# EAGLE board ESP32_heart_revC3_check (EAGLE 9.6.1)
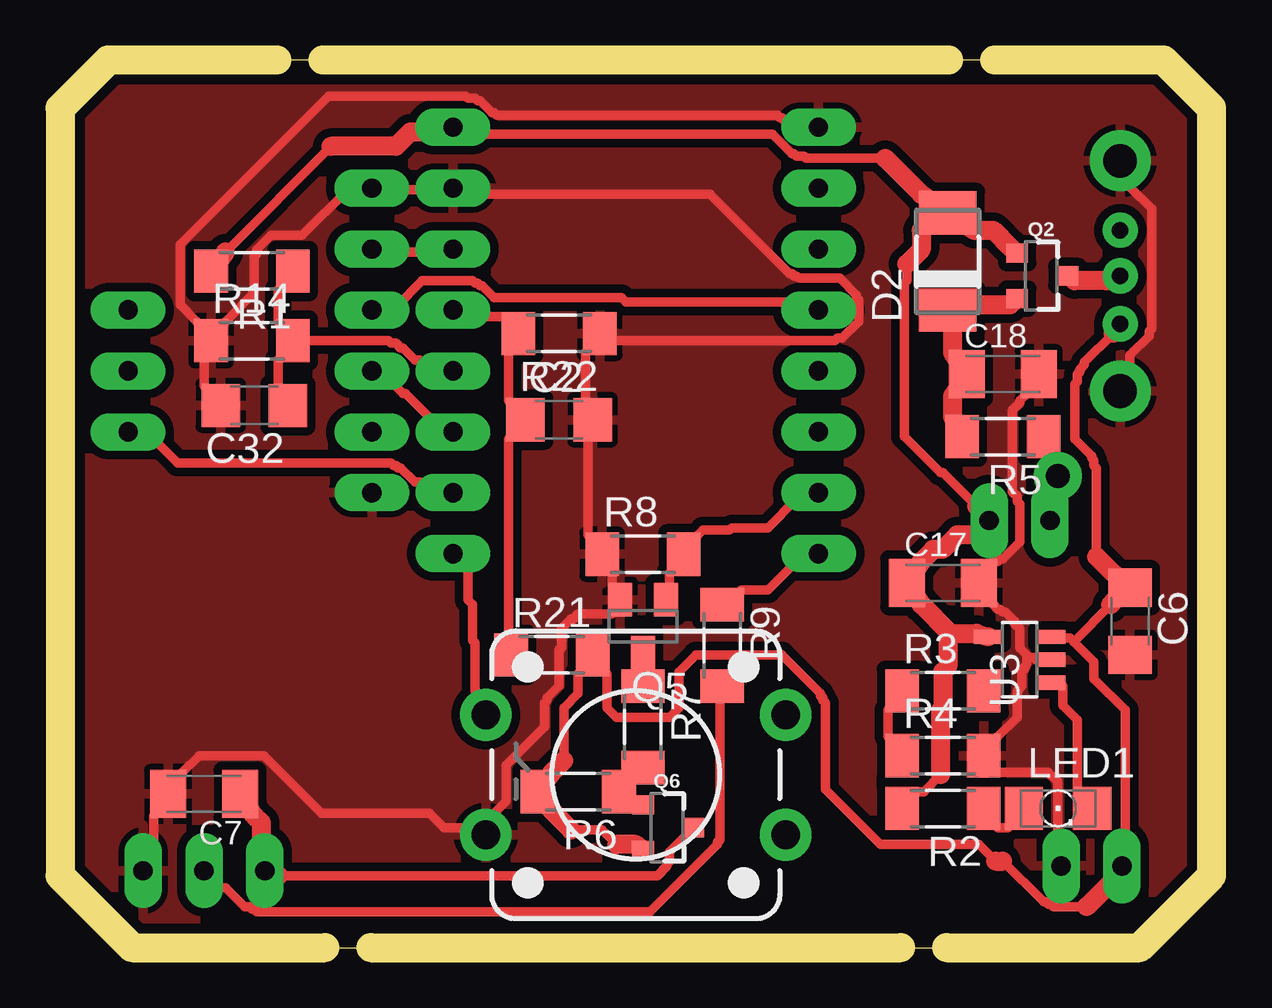
[diagram p0: board, top side]
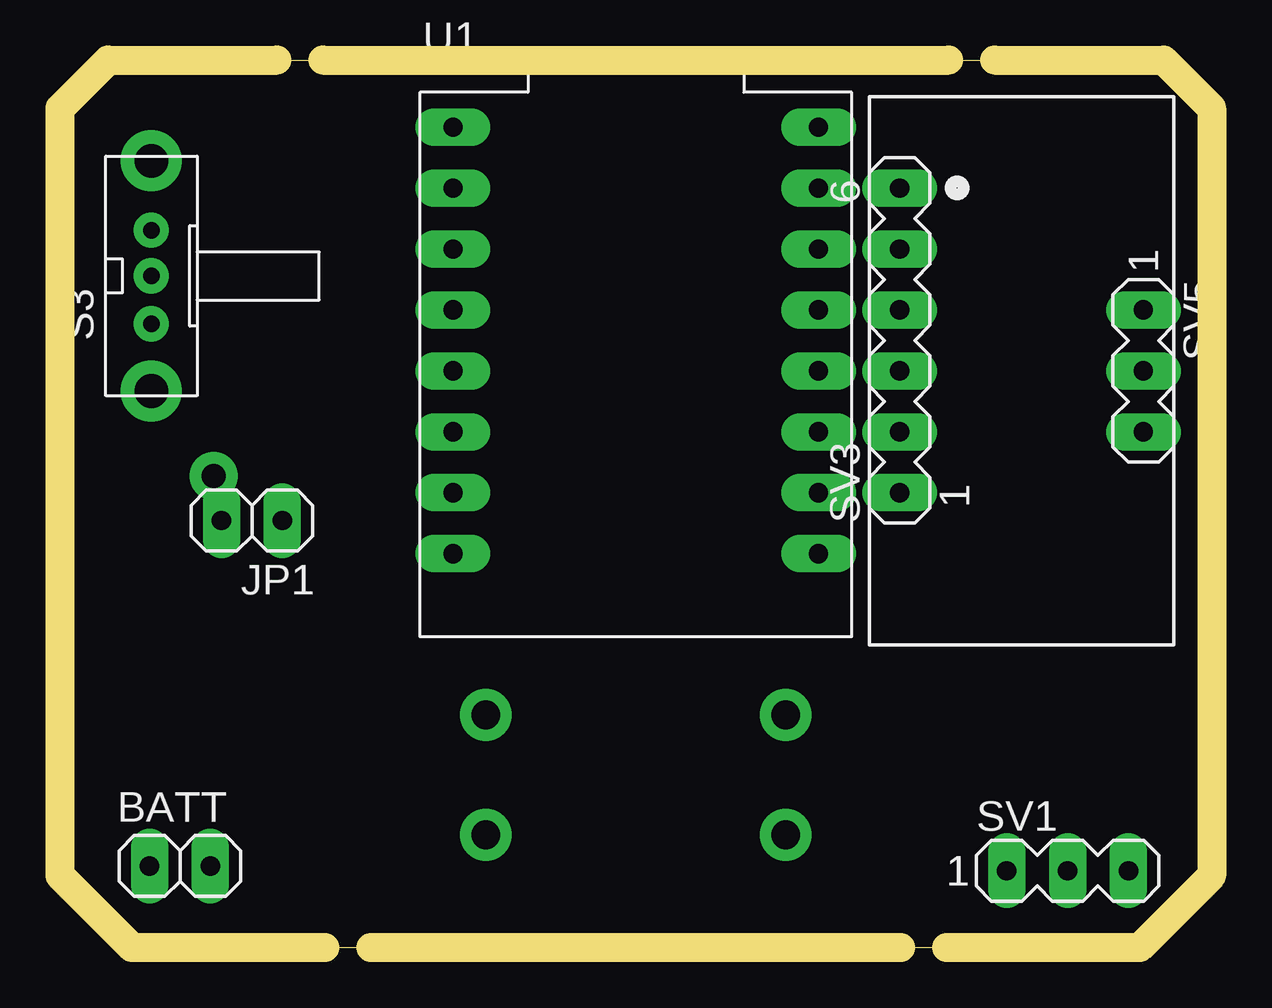
[diagram p1: board, bottom side, seen from below]

Size 48 x 37 mm. Coordinates in mm from the lower left corner, seen from the top.
Outline: 3,0 45,0 48,3 48,35 46,37 2,37 0,35 0,3 3,0
Copper layers (1*16): Top 0.035mm / dielectric 1.5mm / Bottom 0.035mm
Design rules "default *": minimum track width 0.4mm, minimum drill 1mm, track to track 0.3mm, track to pad 0.3mm, pad to pad 0.3mm, via to via 0.3mm, smd to smd 6mil, copper to edge 40mil, drill to drill 0.5mm, minimum pad ring 15mil, minimum via ring 8mil, stop-mask expansion 4mil, vias tented up to drill 0mil, thermal gap 10mil
Milling: 12 lines

## Footprints (pad centres in the part's own frame; a part is rotated, then mirrored left to right if it is on the bottom)
1X02 = drill 0.8 pad 1.3 long: 1 -1.27,0; 2 1.27,0
C1206 = smd 1.6 x 1.8: 1 -1.4,0; 2 1.4,0
C1206K = smd 1.5 x 2: 1 -1.5,0; 2 1.5,0
DO-214AC = smd 1.8 x 2.4: A 2.025,0; C -2.025,0
1206 = smd 1.6 x 1.803: A -1.422,0; C 1.422,0
SOT23-3 = smd 0.8 x 0.9: 1 -0.95,-1; 2 0.95,-1; 3 0,1.1
SOT23 = smd 1 x 1.4: 1 -0.95,-1.1; 2 0.95,-1.1; 3 0,1.1
M1406 = smd 1.4 x 1.8: 1 -1.7,0; 2 1.7,0
TACTILE-PTH-12MM = drill 1.2 pad 2.159: 1 6.25,-2.5; 2 -6.25,-2.5; 3 6.25,2.5; 4 -6.25,2.5
EG1213 = drill 0.7 pad 1.422: 1 -2,0; 2 0,0; 3 1.9,0 | drill 1.4 pad 2.54: MT1 -4.8,0; MT2 4.8,0
MA03-1 = drill 0.8 pad 1.3 long: 1 -2.54,0; 2 0,0; 3 2.54,0
MA06-1 = drill 0.8 pad 1.3 long: 1 -6.35,0; 2 -3.81,0; 3 -1.27,0; 4 1.27,0; 5 3.81,0; 6 6.35,0
MODULE_ESP32-C3_SUPERMINI_TH = drill 0.8 pad 1.3 long: 0 7.62,-7.88; 1 7.62,-5.34; 2 7.62,-2.8; 3 7.62,-0.26; 3.3 7.62,4.82; 4 7.62,2.28; 5 -7.62,9.9; 5V 7.62,9.9; 6 -7.62,7.36; 7 -7.62,4.82; 8 -7.62,2.28; 9 -7.62,-0.26; 10 -7.62,-2.8; 20 -7.62,-5.34; 21 -7.62,-7.88; G 7.62,7.36
TP4054 = smd 0.6 x 1.2: 1 -0.95,-1.306; 2 0,-1.306; 3 0.95,-1.306; 4 0.95,1.306; 5 -0.95,1.306

## Placement (x,y rotation side)
BATT  [1X02]  43,3.4 0 bottom
C2  100nf  [C1206]  20.8,22 0 top
C6  1uf  [C1206]  44.6,13.6 270 top
C7  100nf  [C1206K]  6,6.4 180 top
C17  100nf  [C1206K]  36.8,15.2 0 top
C18  100nf  [C1206K]  39.3,23.9 0 top
C32  100nf  [C1206]  8.1,22.6 180 top
D2  [DO-214AC]  37,28.6 90 top
JP1  [1X02]  40,17.8 180 bottom
LED1  DNP  [1206]  41.6,5.8 0 top
Q2  CMN3401M  [SOT23-3]  40.9,28 270 top
Q5  CMN2302BSM  [SOT23]  24.3,13.4 180 top
Q6  CMN3401M  [SOT23-3]  25.3,5 270 top
R1  68k  [M1406]  8,28.2 180 top
R2  1K  [M1406]  36.8,5.8 180 top
R3  1K  [M1406]  36.8,10.7 0 top
R4  1K  [M1406]  36.8,8 0 top
R5  0  [M1406]  39.3,21.3 180 top
R6  10K  [M1406]  21.6,6.5 180 top
R7  1K  [M1406]  24.3,9.2 270 top
R8  10K  [M1406]  24.3,16.4 0 top
R9  330  [M1406]  27.6,12.6 270 top
R14  100k  [M1406]  8,25.3 0 top
R21  1M  [M1406]  20.5,12.2 0 top
R22  1M  [M1406]  20.8,25.6 180 top
S1  SWITCH-MOMENTARY-2-CLOSED  [TACTILE-PTH-12MM]  24,7.2 180 top
S3  EG1213  [EG1213]  44.19,28 90 bottom
SV1  [MA03-1]  6,3.2 0 bottom
SV3  [MA06-1]  13,25.31 90 bottom
SV5  [MA03-1]  2.84,24.04 270 bottom
U1  ESP32-C3_SUPERMINI_TH  [MODULE_ESP32-C3_SUPERMINI_TH]  24,24.3 0 bottom
U3  TP4054  [TP4054]  40,12 90 top

## Library data of the parts
BATT JP1 = pinhead
C2 C6 C7 C17 C18 C32 LED1 Q5 R1-R9 R14 R21 R22 S3 = adafruit
D2 = diode
Q2 Q6 = SparkFun-DiscreteSemi; PROD_ID: TRANS-08285
S1 = SparkFun-Retired
SV1 SV3 SV5 = con-lstb; OC_FARNELL: unknown; OC_NEWARK: unknown
U1 = ESP32-C3_SUPERMINI_TH; AVAILABILITY: Not in stock; CHECK_PRICES: https://www.snapeda.com/parts/ESP32-C3%20SuperMini_TH/Espressif+Systems/view-part/?ref=eda; DESCRIPTION: Super tiny ESP32-C3 board; MF: Espressif Systems; MP: ESP32-C3 SuperMini_TH; PACKAGE: Package; PRICE: None; SNAPEDA_LINK: https://www.snapeda.com/parts/ESP32-C3%20SuperMini_TH/Espressif+Systems/view-part/?ref=snap
U3 = TP4054

## Nets
3V3: SV3.2 U1.3.3
6: U1.6
A1: S1.1 U1.0
BATT+: BATT.1 C6.1 Q6.2 R6.2 R21.2 S3.3 U3.3
GND: BATT.2 C2.2 C6.2 C7.2 C17.2 C18.2 C32.2 Q5.2 R4.2 R8.1 R14.1 R22.1 S1.3 S3.MT1 S3.MT2 SV1.3 SV3.1 U1.5 U1.G U3.2
IMU_INT: SV5.1 U1.1
LED_CTRL: R9.1 U1.21
LED_DIN: R9.2 SV1.2
LED_EN: Q5.1 R8.2 U1.20
N$1: R3.2 U3.5
N$2: R3.1 R4.1
N$4: LED1.C U3.1
N$5: LED1.A R2.1
N$6: Q2.3 S3.2
N$7: Q5.3 R7.1
N$14: Q6.1 R6.1 R7.2
N$15: C7.1 Q6.3 SV1.1
N$18: C18.1 D2.C Q2.2 R5.2
SCL: SV3.4 U1.2
SDA: SV3.3 U1.8
USB_CHARGE: C32.1 R1.1 R14.2 U1.3
USB_IN: C17.1 D2.A JP1.1 Q2.1 R1.2 R2.2 U1.5V U3.4
USB_OUT: JP1.2 R5.1
VBAT_SENSE: C2.1 R21.1 R22.2 U1.4

## Tracks (layer width: path | path; a pad name or v marks a point on that pad's centre or on a via)
3V3
  Top 0.4: U1.3.3 15.4,29 14,29 13,29.12
A1
  Top 0.4: U1.0 17,15.9 17,14.5 17.2,14.3 17.2,12.8 17.3,12.7 17.3,10.7 17.4,10.6 S1.1
BATT+
  Top 0.4: 43.9,25.6 42.7,24.4 42.7,24.3 42.5,24.1 42.5,24 42.4,23.9 42.4,23.6 42.3,23.5 42.3,21.2 43,20.5 43,20.4 43.1,20.3 43.1,20.1 43.2,20 43.2,16.3 | R21.2 21.6,11.4 21.6,10.6 21,10 21,7.8 | 23.2,4.3 22.6,4.9 21.3,4.9 | 22.03,11.98 22.8,11.4 22.8,10 23.2,9.6 25.4,9.6 25.8,10 25.8,11.5 26.5,12.2 30.1,12.2 31.7,10.6 31.7,10.5 31.8,10.4 31.8,10.3 31.9,10.2 31.9,6.6 34.2,4.3 38.3,4.3 39,3.6 | 39.3,3.6 41,1.9 41.1,1.9 41.2,1.8 41.3,1.8 41.4,1.7 42.8,1.7 | 44.4,4.4 44.4,9.9 43.1,11.2 43.1,11.9 42.1,12.9 41.8,12.9 U3.3 | 42.25,12.75 43.8,14.3
  Top 0.8: 44.19,26.1 43.9,25.6 | 43.2,16.3 43.8,15.7 C6.1 | 21,7.8 20.5,7.3 R6.2 20.5,5.7 21.3,4.9 | Q6.2 24,4.3 23.2,4.3 | 39,3.6 39.3,3.6 | 42.8,1.7 43.8,2.7 BATT.1 44.4,4.4 | 43.8,14.3 44.49,15.09
GND
  Top 0.4: S3.MT1 44.6,24.3 44.6,24.7 45.4,25.5 45.4,25.7 45.5,25.8 45.5,30.8 44.6,31.7 S3.MT2 | C18.2 40.2,23 40,22.8 40,22.7 39.7,22.4 39.7,19 39.9,18.8 39.9,18.6 40,18.5 40,16.9 39.3,16.2 39.2,16.2 39.1,16.1 38.9,16.1 C17.2 38.9,14.3 39.1,14.1 39.2,14.1 39.3,14 39.4,14 39.8,13.6 39.8,13.5 40,13.3 40,12.5 40.4,12.1 40.6,12.1 40.7,12 U3.2 | U1.5 30.7,34.5 30.2,34.5 30.1,34.6 30,34.6 29.9,34.7 18.2,34.7 18.1,34.8 18,34.8 17.5,35.3 17.4,35.3 17.3,35.4 17,35.4 16.9,35.5 11.2,35.5 5,29.3 5,26.8 5.7,26.1 R14.1 6,24.5 6,23.4 C32.2 | 6.13,25.52 6.9,26.1 8.1,27.3 8.1,28.8 8.2,28.9 8.2,29.1 8.8,29.7 10.1,29.7 12,31.6 13,31.66 14,31.6 15.4,31.6 U1.G 17.3,31.4 27.1,31.4 30.4,28.1 30.5,28.1 30.6,28 30.7,28 30.8,27.9 32.5,27.9 33.2,27.2 33.2,27.1 33.3,27 33.3,26.1 32.6,25.4 32.4,25.4 32.3,25.3 23.1,25.3 R22.1 21.9,24.8 21.9,22.8 C2.2 22,21.2 22,17.2 R8.1 23,15.6 23,15.1 Q5.2 23,13.9 21.6,13.9 21.4,13.7 21.3,13.7 20.9,13.3 20.9,12.5 20.8,12.4 20.8,10.9 20.3,10.4 20.3,10.3 20.2,10.2 20.2,9.2 18.6,7.6 18.6,6.1 18.1,5.6 S1.3 16.8,5 16,5 15.4,5.6 10.9,5.6 8.5,8 5.8,8 5.1,7.3 C7.2 3.9,5.5 3.9,4.5 3.6,4.2 SV1.3 | 40.35,12.15 40.3,12.1 40.3,11.8 40.2,11.7 40.2,11.6 40.1,11.5 40.1,10.9 39.9,10.7 39.9,9.6 39.1,8.8 R4.2 39.1,7.3 41.2,7.3 41.6,6.9 41.6,4.4 BATT.2
  pour Top (isolate 0.35): 3,0 45,0 48,3 48,35 46,37 2,37 0,35 0,3
IMU_INT
  Top 0.4: U1.1 15.4,19.1 15.2,19.3 15.1,19.3 15,19.4 14.8,19.4 14.2,20 14.1,20 14,20.1 13.9,20.1 13.8,20.2 4.9,20.2 3.8,21.3 2.84,21.5
LED_CTRL
  Top 0.4: U1.21 30.7,16.1 29.5,14.9 28.4,14.9 R9.1
LED_DIN
  Top 0.4: SV1.2 6.5,2.5 6.9,2.5 7.7,1.7 7.9,1.7 8,1.6 8.1,1.6 8.2,1.5 24.6,1.5 27.4,4.3 27.4,4.4 27.5,4.5 27.5,10.3 R9.2
LED_EN
  Top 0.4: U1.20 30.7,18.7 29.5,17.5 28,17.5 27.9,17.4 26.8,17.4 26.6,17.2 R8.2 25.4,15.6 25.4,15.1 Q5.1
N$2
  Top 0.4: R3.1 34.5,9.9 34.5,8.8 R4.1
N$4
  Top 0.4: U3.1 41.8,10.9 41.8,10.1 42.4,9.5 42.4,6.6 LED1.C
N$5
  Top 0.4: R2.1 39.1,5 39.5,5 LED1.A
N$6
  Top 0.8: S3.2 43.6,27.8 42.3,27.8 Q2.3
N$15
  Top 0.4: 9.1,3 24.9,3 25.3,3.4 25.3,3.5 25.4,3.6 25.4,4 Q6.3
  Top 0.8: 9.1,3 SV1.1 8.4,4.2 8.4,5.2 8.1,5.5 C7.1
N$18
  Top 0.8: D2.C 37.2,25.8 37.2,24.8 C18.1 37.2,23 37.2,22.1 R5.2 | 37.01,26.52 38.1,26.8 39.6,26.8 Q2.2
SCL
  Top 0.4: U1.2 15.6,21.9 14.4,23.1 14.3,23.1 13.8,23.6 13,24.04
SDA
  Top 0.4: U1.8 30.7,26.9 23.6,26.9 23.4,27.1 18.1,27.1 17.6,27.6 17.5,27.6 17.4,27.7 17.3,27.7 17.2,27.8 15.1,27.8 14,26.7 13,26.58
USB_CHARGE
  Top 0.4: U1.3 15.4,24.2 15.2,24.4 15.1,24.4 15,24.5 14.8,24.5 14.3,25 14.2,25 14,25.2 13.8,25.2 13.7,25.3 R14.2 | R14.2 9.1,24.5 9.1,23.4 C32.1 | R14.2 9.1,26.1 9.1,27.4 R1.1
USB_IN
  Top 0.4: 11.3,33.4 6.9,29 | 17.3,33.9 29.7,33.9 30.5,33.1 30.6,33.1 30.7,33 31,33 31.1,32.9 34.4,32.9 | 35.3,28.5 35.3,27.8 35.2,27.7 35.2,21.3 36.7,19.8 36.8,19.8 38.2,18.4 | 36.7,7.2 36,6.5 35.7,6.5 R2.2
  Top 0.8: 11.3,33.4 14,33.4 14.6,34 15.4,34 U1.5V 17.3,33.9 | 6.9,29 R1.2 | 34.4,32.9 35.9,31.4 D2.A 38.1,29.9 38.9,29.9 39.6,29.2 Q2.1 | 36.61,30.9 35.9,29.9 35.9,29.1 35.3,28.5 | 38.2,18.4 JP1.1 38.2,17.2 37.4,17.2 36.8,16.6 36.4,16.6 35.9,16.1 C17.1 35.9,14.3 37.1,13.1 38.2,13.1 U3.4 | 37.05,13.15 37,13.1 37,11.7 36.8,11.5 36.8,10 36.7,9.9 36.7,7.2
USB_OUT  (via drill 1 pad 2)
  other vias: 41.6,19.65
VBAT_SENSE
  Top 0.4: U1.4 17.3,26.3 18.5,26.3 R22.2 18.7,24.8 18.7,22.8 C2.1 18.7,21.2 18.7,13 R21.1